# Allegro board OBcP_v2_3_V1.brd
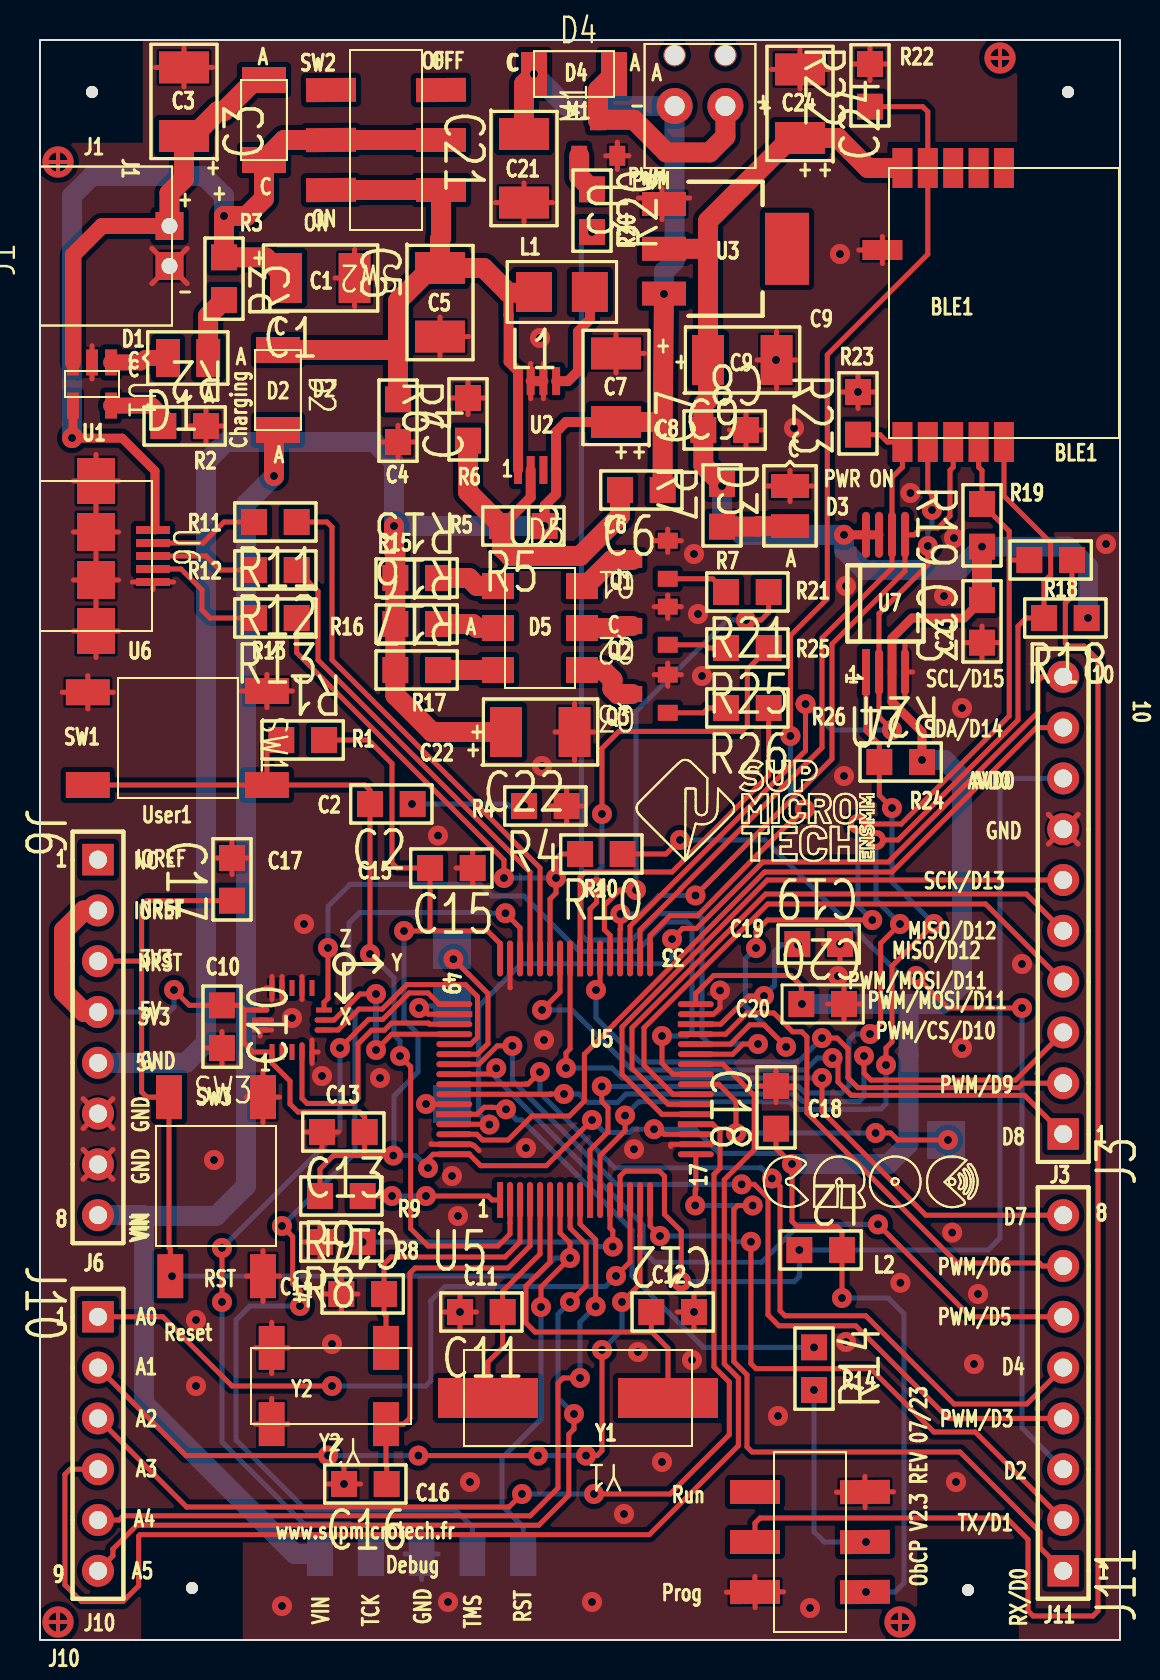
[diagram p0: board, top side]
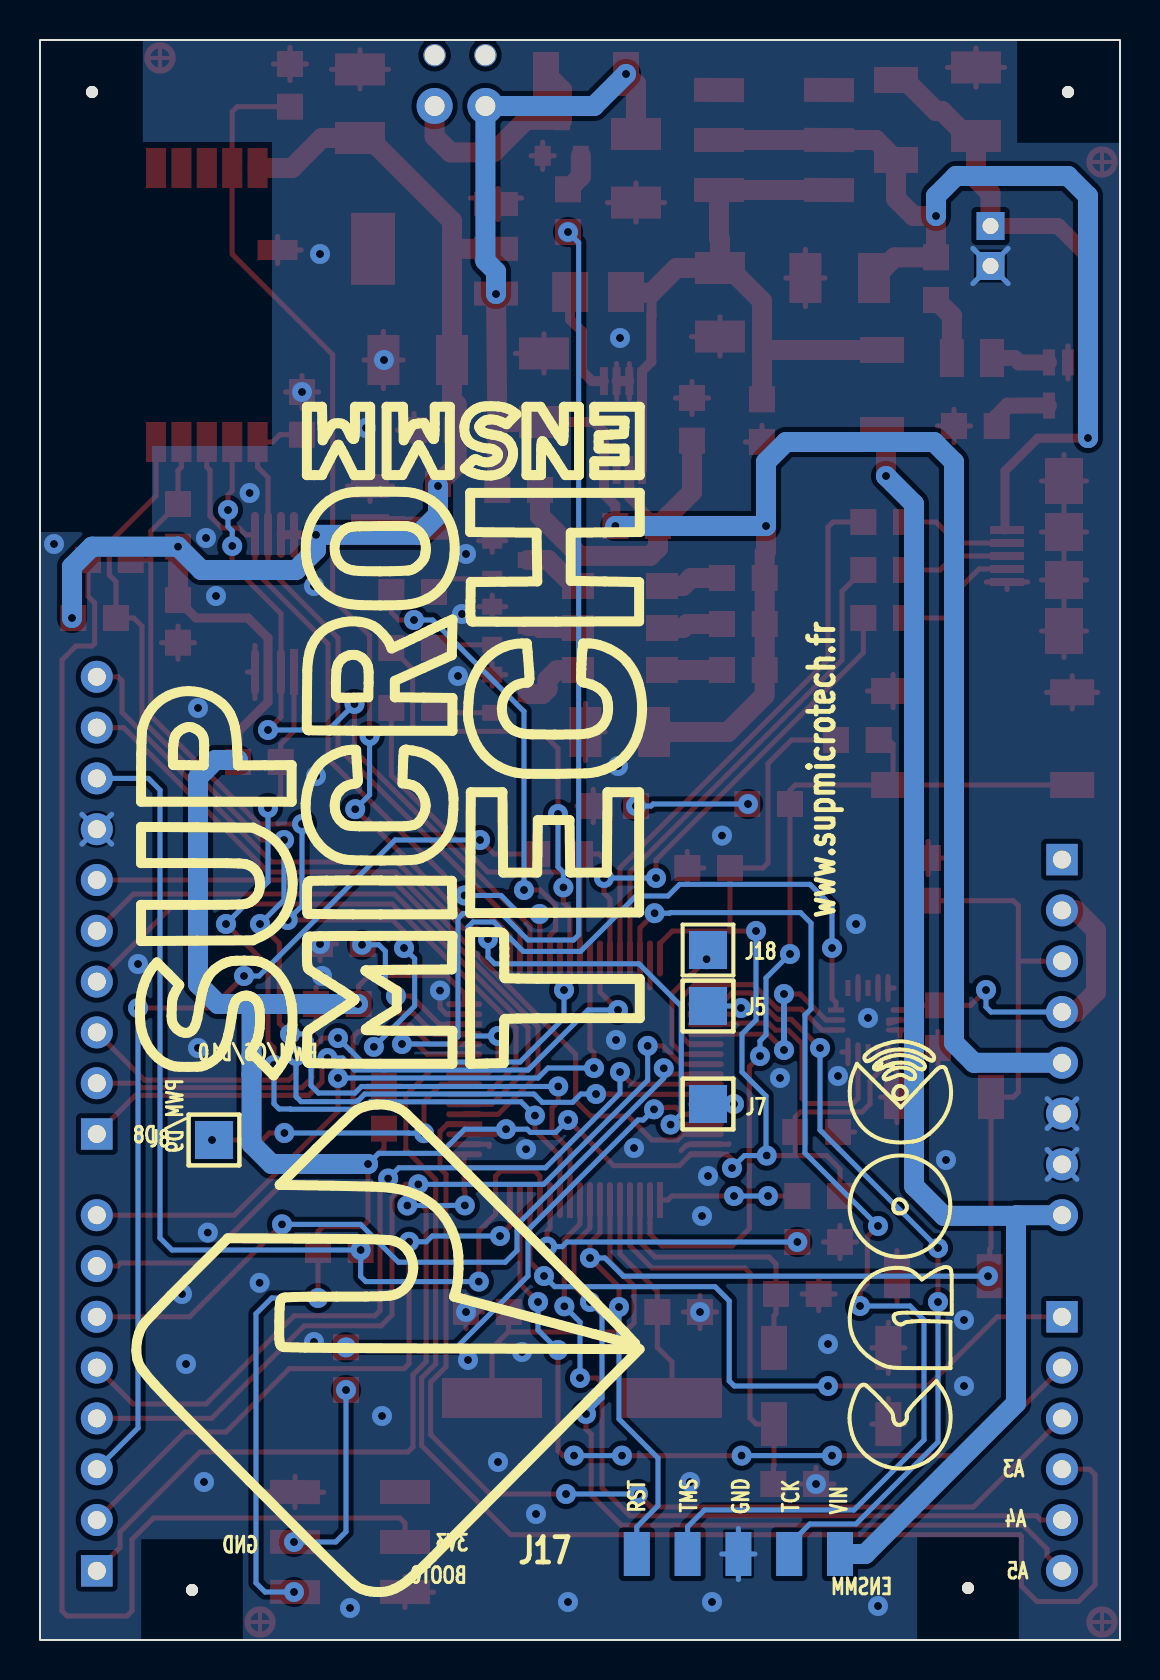
[diagram p1: board, bottom side, seen from below]

Outline 54 x 80 mm; copper layers: TOP, BOTTOM. Coordinates in mm from the lower left corner of the outline.
Outline path: rectangle 0,0 54,80

## Design rules (mm)
constraint set DEFAULT: min track width 0.254
net group BOOT0: nets BOOT0 N162657
net group BOOT1: nets BOOT1 N1626050
net group N10069: nets N10069 N12723
net group PA11: nets N1752391 PA11
net group PA12: nets N175467 PA12
net group PB1: nets N175669 PB1
net group PC6: nets N177253 PC6
net group PC8: nets N177329 PC8
net group PC9: nets N177405 PC9
net group PC13: nets N176603 PC13
net group VUSB: nets N120430 VUSB
net group 5V: nets 5V N14490 N177015 N177019 N1768891
net group PA10: nets N175521 PA10 USB_ID

## Placement (name value [footprint] x y rotation side)
BLE1  SPBTLE-RF0TR  [MODULEBLE]  48.2 73.6 270 top
C1  10u  [SMCT1210]  12.3 68.1 0 top
C2  100n  [SMC0805]  16.5 41.8 0 top
C3  10u  [SMCT1210]  7.2 75.2 90 top
C4  100n  [SMC0805]  17.9 59.9 90 top
C5  10u  [SMCT1210]  20 68.6 270 top
C6  27p  [SMC0805]  29 57.5 0 top
C7  10u  [SMCT1210]  28.8 60.9 90 top
C8  100n  [SMC0805]  35.3 60.5 180 top
C9  10u  [SMCT1210]  33.4 64 0 top
C10  100n  [SMC0805]  9.1 29.6 90 top
C11  20p  [SMC0805]  21 16.4 0 top
C12  20p  [SMC0805]  32.7 16.4 180 top
C13  100n  [SMC0805]  14.1 25.4 0 top
C14  4.3p  [SMC0805]  17.2 17.3 180 top
C15  100n  [SMC0805]  19.5 38.6 0 top
C16  4.3p  [SMC0805]  15.2 7.8 0 top
C17  100n  [SMC0805]  9.6 39.1 270 top
C18  100n  [SMC0805]  36.8 27.7 270 top
C19  4.7u  [SMC0805]  40 34.8 180 top
C20  100n  [SMC0805]  40.2 31.8 180 top
C21  10u  [SMCT1210]  24.2 75.3 270 top
C22  10u  [SMCT1210]  23.3 45.4 0 top
C23  100n  [SMC0805]  47.1 52 270 top
C24  10u 16V  [SMCT1210]  38 75.1 90 top
D1  LED_RED  [SMD0805]  6.4 64.1 0 top
D2  RS1J_13_F  [DIODESMA]  11.9 64.5 270 top
D3  LED_GREEN  [SMD0805]  37.5 57.7 270 top
D4  RS1J_13_F  [DIODESMA]  24.7 78.3 0 top
D5  LED TRI-COLOUR  [LEDRVB]  25 50.6 0 top
D6  RS1J_13_F  [DIODESMA]  11.2 74 90 top
J1  Batterie_Lithium  [CONALIM]  3.3 69.7 90 top
J3  Digital  [BLKCON100VHTM1SQSW10010]  51.16 25.3 90 top
J5  TX  [BLKCON100VHTM1SQW1001]  20.6 31.7 180 bottom
J6  Power  [BLKCON100VHTM1SQSW1008]  2.9 39.02 270 top
J7  RX  [BLKCON100VHTM1SQW1001]  20.6 26.8 180 bottom
J8  PC4  [BLKCON100VHTM1SQW1001]  45.3 25 180 bottom
J10  Analog  [BLKCON100VHTM1SQSW1006]  2.9 16.16 270 top
J11  Digital2  [BLKCON100VHTM1SQSW1008]  51.16 3.46 90 top
J13  PWM  [BORNIER2]  33 76.7 180 top
J17  Debug  [DEBUG_CON2]  14 4.3 0 bottom
J18  PD2  [BLKCON100VHTM1SQW1001]  20.6 34.5 180 bottom
L1  4.7uH  [SML1210]  24.7 67.4 0 top
L2  Perle_HF  [SMR0805]  40.1 19.5 180 top
M1  IRLML2803  [SOT23]  27.9 75.1 90 top
NOREF  -  [unnamed]  46.4 2.5 0 top
NOREF#2  -  [unnamed]  51.4 77.4 0 top
NOREF#3  -  [unnamed#2]  0.9 73.9 0 top
NOREF#4  -  [unnamed]  2.6 77.4 0 top
NOREF#5  -  [unnamed#2]  48 79.1 0 top
NOREF#6  -  [unnamed]  7.6 2.6 0 top
NOREF#7  -  [#2]  30.2 39.3 0 top
NOREF#8  -  [unnamed#2]  43 0.9 0 top
NOREF#9  -  [#2]  36.1 21.6 0 top
NOREF#10  -  [unnamed#2]  0.9 0.9 0 top
NOREF#11  -  [#2]  8.6 8.6 90 bottom
NOREF#12  -  [#2]  23.4 14.7 90 bottom
Q1  2N2222  [SOT23]  30.5 54 180 top
Q2  2N2222  [SOT23]  30.5 50.7 180 top
Q3  2N2222  [SOT23]  30.5 47.3 180 top
R1  4.7k  [SMR0805]  14.2 45 180 top
R2  2k  [SMR0805]  8.3 60.7 180 top
R3  470  [SMR0805]  9.2 67 90 top
R4  100  [SMR0805]  24.2 41.7 0 top
R5  976k  [SMR0805]  23.1 55.7 0 top
R6  309k  [SMR0805]  21.4 62.1 270 top
R7  100  [SMR0805]  34.1 57.8 270 top
R8  0  [SMR0805]  14 19.9 0 top
R9  0  [SMR0805]  14 22.2 0 top
R10  470  [SMR0805]  27 39.3 0 top
R11  22  [SMR0805]  10.7 55.9 0 top
R12  22  [SMR0805]  10.7 53.5 0 top
R13  22  [SMR0805]  10.7 51.1 0 top
R14  22  [SMR0805]  38.7 12.5 90 top
R15  100  [SMR0805]  19.9 53.1 180 top
R16  100  [SMR0805]  19.9 50.8 180 top
R17  100  [SMR0805]  19.9 48.5 180 top
R18  10k  [SMR0805]  50.2 51.1 0 top
R19  10k  [SMR0805]  47.1 56.8 270 top
R20  470  [SMR0805]  27.6 70.4 90 top
R21  1k  [SMR0805]  34.3 52.4 0 top
R22  47k  [SMR0805]  41.5 78.8 270 top
R23  100k  [SMR0805]  40.9 62.4 270 top
R24  100k  [SMR0805]  44.1 43.9 180 top
R25  1k  [SMR0805]  34.3 49.6 0 top
R26  1k  [SMR0805]  34.3 46.6 0 top
R27  22  [SMR0805]  51.6 54 180 top
SW1  User3  [PUSHBUTTONOBCP]  6.9 45.1 270 top
SW2  Interrupteur  [INTERUPTEUR]  17.3 75 180 top
SW3  Reset  [PUSHBUTTONOBCP]  8.8 22.7 0 top
SW4  Interrupteur  [INTERUPTEUR]  38.5 4.9 0 top
U1  MCP73831  [5LEADSOT23]  2.6 62.8 270 top
U2  MCP1642  [MSOP8]  23.9 58.5 0 top
U3  LD1117S33TR  [TO261AASOT223]  31.1 72.1 270 top
U4  LIS3DSH  [LGA_16]  12.6 31 90 top
U5  STM32L476RGT6  [QUAD50M64WG1260]  23 22 0 top
U6  USB  [CONUSB]  2.8 54.2 270 top
U7  M95640  [SOG65M8WG820L380]  41.3 48.4 0 top
Y1  CRYSTAL_8_MHz  [QUARTZ8MHZ]  26.9 12.1 180 top
Y2  ANS25-32.768KHZ-6-T  [QUARTZ36KHZ]  17.3 12.7 180 top

## Library data of the parts
BLE1 = SPBTLE-RF0TR
C1 C3 C5 C7 C9 C21 C22 C24 = CP
C2 C4 C6 C8 C10-C20 C23 = C
D1 D3 = LED0805
D2 D4 D6 = DIODE_3
D5 = LED TRI-COLOUR_1
J1 = CON2_0
J3 = CON10
J5 J7 J8 J18 = CON1
J6 J11 = CON8
J10 = CON6
J13 = CON2
J17 = CON5
L1 L2 = L
M1 = IRLML2803
Q1-Q3 = 2N2222_0
R1-R27 = R
SW1 SW3 = SW PUSHBUTTON_0
SW2 SW4 = SW KEY-Y1011_1
U1 = MCP73831
U2 = MCP1642_1
U3 = LD1117S33TR_0
U4 = LIS3DSH_0
U5 = STM32F411RET6
U6 = USB_con_3
U7 = M95640
Y1 = CRYSTAL
Y2 = ANS25-32_0.768KHZ-6-T

## Footprints (pads in the part's own frame, mm; a bottom-side part is the same pattern mirrored in y, then rotated)
5LEADSOT23
  rect 1.3x0.6 smd: 1(-1.079,0.953) 2(-1.079,0) 3(-1.079,-0.953) 4(1.079,-0.953) 5(1.079,0.953)
BLKCON100VHTM1SQSW1006
  rect 1.575x1.575 hole 0.9: 1(0,0)
  round 1.6 hole 0.9: 2(2.54,0) 3(5.08,0) 4(7.62,0) 5(10.16,0) 6(12.7,0)
BLKCON100VHTM1SQSW1008
  rect 1.575x1.575 hole 0.9: 1(0,0)
  round 1.6 hole 0.9: 2(2.54,0) 3(5.08,0) 4(7.62,0) 5(10.16,0) 6(12.7,0) 7(15.24,0) 8(17.78,0)
BLKCON100VHTM1SQSW10010
  rect 1.575x1.575 hole 0.9: 1(0,0)
  round 1.6 hole 0.9: 2(2.54,0) 3(5.08,0) 4(7.62,0) 5(10.16,0) 6(12.7,0) 7(15.24,0) 8(17.78,0) 9(20.32,0) 10(22.86,0)
BLKCON100VHTM1SQW1001
  rect 1.9x1.9 smd: 1(0,0)
BORNIER2
  round 1.12 hole 1: (-1.27,-2.54) (1.27,-2.54)
  round 1.8 hole 1: 1(-1.27,0) 2(1.27,0)
CONALIM
  rect 1.4x1.4 hole 0.8: +(1,-3.175) -(-1,-3.175)
CONUSB
  rect 0.4x1.7 smd: 1(-1.3,2.85) 2(-0.65,2.85) 3(0,2.85) 4(0.65,2.85) 5(1.3,2.85)
  rect 1.9x1.9 smd: 6(-1.2,0) 7(1.2,0)
  rect 2.3x1.9 smd: 8(-3.75,0) 9(3.75,0)
DEBUG_CON2
  rect 1.3x2.2 smd: 1(0,0) 2(2.54,0) 3(5.08,0) 4(7.62,0) 5(10.16,0)
DIODESMA
  rect 1.3x2.2 smd: 1(0,0) 2(4,0)
INTERUPTEUR
  rect 2.5x1.2 smd: 1(-2.75,2.5) 2(-2.75,0)
  rect 1.2x2.5 smd rot 90.4: 3(-2.75,-2.5) 4(2.75,2.5) 5(2.75,0) 6(2.75,-2.5)
LEDRVB
  rect 1.6x1.3 smd: 1(-2.1,2.1) 2(-2.1,0) 3(-2.1,-2.1) 4(2.1,-2.1) 5(2.1,0) 6(2.1,2.1)
LGA_16
  rect 0.8x0.25 smd: 1(-1.6,1) 2(-1.6,0.5) 3(-1.6,0) 4(-1.6,-0.5) 5(-1.6,-1) 9(1.6,-1) 10(1.6,-0.5) 11(1.6,0) 12(1.6,0.5) 13(1.6,1)
  rect 0.25x0.8 smd: 6(-0.5,-1.6) 7(0,-1.6) 8(0.5,-1.6) 14(0.5,1.6) 15(0,1.6) 16(-0.5,1.6)
MODULEBLE
  rect 2x1 smd: 1(0,0) 2(0,-1.27) 3(0,-2.54) 4(0,-3.81) 5(0,-5.08) 7(13.7,-5.08) 8(13.7,-3.81) 9(13.7,-2.54) 10(13.7,-1.27) 11(13.7,0)
  rect 1x2 smd: 6(4.1,-6.08)
MSOP8
  rect 0.4x1.4 smd: 1(0,0) 2(0.635,0) 3(1.27,0) 4(1.905,0) 5(1.905,4.445) 6(1.27,4.445) 7(0.635,4.445) 8(0,4.445)
PUSHBUTTONOBCP
  rect 1.3x2.2 smd: 1(2.349,4.445) 2(2.349,-4.508) 3(-2.349,4.445) 4(-2.286,-4.508)
QUAD50M64WG1260
  rect 0.3x1.8 smd: 1(0,0) 10(4.503,0) 40(4.003,12.078)
  oval 0.3x1.8 smd: 2(0.5,0) 3(1.001,0) 4(1.501,0) 5(2.002,0) 6(2.502,0) 7(3.002,0) 8(3.503,0) 9(4.003,0) 11(5.004,0) 12(5.504,0) 13(6.005,0) 14(6.505,0) 15(7.005,0) 16(7.506,0) 33(7.506,12.078) 34(7.005,12.078) 35(6.505,12.078) 36(6.005,12.078) 37(5.504,12.078) 38(5.004,12.078) 39(4.503,12.078) 41(3.503,12.078) 42(3.002,12.078) 43(2.502,12.078) 44(2.002,12.078) 45(1.501,12.078) 46(1.001,12.078) 47(0.5,12.078) 48(0,12.078)
  oval 1.8x0.3 smd: 17(9.792,2.286) 18(9.792,2.786) 19(9.792,3.287) 21(9.792,4.287) 22(9.792,4.788) 23(9.792,5.288) 24(9.792,5.789) 25(9.792,6.289) 26(9.792,6.789) 27(9.792,7.29) 28(9.792,7.79) 29(9.792,8.291) 31(9.792,9.291) 32(9.792,9.792) 49(-2.286,9.792) 51(-2.286,8.791) 52(-2.286,8.291) 53(-2.286,7.79) 54(-2.286,7.29) 55(-2.286,6.789) 56(-2.286,6.289) 57(-2.286,5.789) 58(-2.286,5.288) 59(-2.286,4.788) 61(-2.286,3.787) 62(-2.286,3.287) 63(-2.286,2.786) 64(-2.286,2.286)
  rect 1.8x0.3 smd: 20(9.792,3.787) 30(9.792,8.791) 50(-2.286,9.291) 60(-2.286,4.287)
QUARTZ8MHZ
  rect 5x2 smd: 1(-4.5,0) 2(4.5,0)
QUARTZ36KHZ
  rect 1.3x2.2 smd: 1(0,-1.905) 2(5.715,-1.905) 3(5.715,1.905) 4(0,1.905)
SMC0805
  rect 1.3x1.3 smd: 1(0,0) 2(2.134,0)
SMCT1210
  rect 1.6x2.5 smd: 1(0,0) 2(3.429,0)
SMD0805
  rect 1.2x1.9 smd: A(2.007,0) C(0,0)
SML1210
  rect 1.8x2 smd: 1(0,0) 2(2.794,0)
SMR0805
  rect 1.3x1.3 smd: 1(0,0) 2(2.134,0)
SOG65M8WG820L380
  rect 0.4x2.3 smd: 1(0,0)
  oval 0.4x2.3 smd: 2(0.65,0) 3(1.3,0) 4(1.951,0) 5(1.951,6.858) 6(1.3,6.858) 7(0.65,6.858) 8(0,6.858)
SOT23
  rect 1x0.8 smd: 1(-0.889,0.94) 2(-0.889,-0.965) 3(0.889,0)
TO261AASOT223
  rect 1.2x2.2 smd: 1(0,0) 2(2.54,0) 3(5.08,0)
  rect 3.6x2.2 smd: 4(2.54,6.35)
unnamed
  round 0.6 hole 3.2 unplated: (0,0)
unnamed#2
  rect 0.2x0.2 smd: (0,0)

## Nets
3.3V: BLE1.5(\VIN\) C8.2 C9.1 C10.2 C13.2 C15.1 C18.2 C20.2 C23.1 C24.1 J6.2 J6.4 L2.1 R1.1 R7.1 R9.1 R18.2 R19.2 R24.1 SW4.6 U3.2(\VOUT\) U4.1 U4.14(\VDD\) U5.19 U5.32 U5.48 U5.64 U7.3(\W\\\) U7.7 U7.8
5V: C6.2 C7.1 C21.1 C22.1 D4.1 J6.5 J13.2 R5.2 R15.2 R16.2 R17.2 U2.4(\VOUT\) U3.3
GND_ANALOG: R8.2 U5.12(\VSSA/VREF-\)
VDDA: J3.8 L2.2 U5.13
VIN: D2.2 J6.8 J17.1
0: BLE1.6 C1.2 C3.2 C4.1 C5.2 C7.2 C8.1 C9.2 C10.1 C11.1 C12.1 C13.1 C14.2 C15.2 C16.1 C17.1 C18.1 C19.1 C20.1 C21.2 C22.2 C23.2 C24.2 D3.C(\CATHODE\) J1.- J3.7 J6.6 J6.7 J17.3 M1.2(\S\) Q1.2(\EMITTER\) Q2.2(\EMITTER\) Q3.2(\EMITTER\) R2.1 R4.2 R6.1 R8.1 R22.1 R23.1 SW1.3 SW1.4 SW3.1 SW3.2 SW4.3 SW4.4 U1.2(\VSS\) U2.6 U2.7 U3.1 U4.5 U4.10 U4.12 U4.13 U4.15 U4.16 U5.18 U5.31 U5.47 U5.63 U6.5 U6.6 U6.7 U6.8 U6.9 U7.4 Y2.2 Y2.3
BOOT0: R14.2 U5.60
BOOT1: BLE1.10 R19.1 R27.2 U5.28
CLK_BLE: BLE1.7 R23.2 U5.34 U7.6
CRYS_8MHZ_1: C11.2 U5.5 Y1.2
CRYS_8MHZ_2: C12.2 U5.6 Y1.1
CS: U4.8 U5.25
IRQ_BLE: BLE1.4 R22.2 U5.33
MISO_BLE: BLE1.8 U5.35 U7.2
MOSI_BLE: BLE1.9 U5.36 U7.5
NRST: C17.2 J6.3 J17.5 SW3.3 SW3.4 U5.7
PA0: J10.1 U5.14
PA1: J10.2 U5.15
PA2: J11.2 U5.16
PA3: J11.1 U5.17
PA4: J10.3 U5.20
PA5: J3.6 U5.21
PA6: J3.5 U5.22
PA7: J3.4 U5.23
PA8: J11.8 U5.41
PA9: J3.1 U5.42
PA10: J11.3 R10.2
PA11: R11.2 U5.44
PA12: R12.2 U5.45
PA13: J17.4 U5.46
PA14: J17.2 U5.49
PA15: J5.1 U5.50
PB0: J10.4 U5.26
PB1: R20.1 U5.27
PB3: J11.4 U5.55
PB4: J11.6 U5.56
PB5: J11.5 U5.57
PB6: J3.3 U5.58
PB7: J7.1 U5.59
PB8: J3.10 U5.61
PB9: J3.9 U5.62
PB10: J11.7 U5.29
PC0: J10.6 U5.8
PC1: J10.5 U5.9
PC2: BLE1.11 R18.1 U5.10
PC3: R24.2 U5.11 U7.1
PC4: J8.1 U5.24
PC6: R21.2 U5.37
PC7: J3.2 U5.38
PC8: R25.2 U5.39
PC9: R26.2 U5.40
PC10: U4.4 U5.51
PC11: U4.7 U5.52
PC12: U4.6 U5.53
PC13: C2.1 R1.2 SW1.1 SW1.2 U5.2
PC14: C14.1 U5.3 Y2.1
PC15: C16.2 U5.4 Y2.4
PD2: J18.1 U5.54
USB_ID: R10.1 R13.2 U5.43
VUSB: C1.1 D6.1 R3.2 SW2.2 SW2.5 U1.4 U6.1(\VCC\)
N04115: C19.2 U5.30
N10061: C3.1 D6.2 J1.+ U1.3
N10069: C4.2 C5.1 D2.1 L1.1 SW2.1 SW2.4 U2.1 U2.8
N11773: R2.2 U1.5
N12723: L1.2 U2.5
N14490: C6.1 R5.1 R6.2 U2.2
N017320: D3.A R7.2
N54486: U3.4
N105400: D1.C(\CATHODE\) U1.1
N113222: R9.2 U5.1
N120430: D1.A R3.1
N162657: R14.1 SW4.5
N175467: R12.1 U6.3
N175501: J6.1
N175511: D4.2 J13.1 M1.3
N175521: R13.1 U6.4
N175669: M1.1 R20.2
N176603: C2.2 R4.1
N177015: D5.1 R15.1
N177019: D5.3 R17.1
N177181: D5.5 Q2.3
N177185: D5.4(6) Q3.3
N177253: Q1.1 R21.1
N177329: Q2.1 R25.1
N177405: Q3.1 R26.1
N1626050: R27.1 SW4.2
N1752391: R11.1 U6.2
N1768891: D5.2 R16.1
N1770832: D5.6 Q1.3

Pads without a net: BLE1 1 2 3; SW2 3 6; SW4 1; U2 3; U4 2 3 9 11

## Via types
v1: diameter 1, hole 0.4, TOP to BOTTOM, 176 vias

## Routing (per net, layer and track width the routed paths; a pad name or vN(x,y) marks a point on that pad's centre or on a via; arc(x,y) is an arc through that point)
3.3V: length 232.6
  TOP w0.254: 16.23,24.22 14.67,24.22 14,23.55 R9.1 ; 16.23,24.22 16.23,25.4 C13.2 16.23,26.15 15.98,26.4 12.9,26.4 12.5,26.8 12.5,27.95 11.6,28.85 U4.1 10.65,29.4 10.2,29.85 10.2,31.5 ; 16.23,24.22 v1(17.66,24.22) ; 10.2,31.5 10.2,31.52 9.99,31.73 C10.2 7.47,31.73 v1(6.7,32.5) ; 10.2,31.5 U4.14 11.35,31.5 ; v1(19.4,23.6) 19.4,24.03 19.65,24.29 U5.64 21.46,24.29 22.03,23.72 25.32,23.72 v1(27.6,26) ; C18.2 36.8,24.59 37.05,24.33 37.07,24.33 v1(37.6,23.8) 37.6,20.93 37.85,20.68 39.85,20.68 40.1,20.43 L2.1 v1(40.1,17.1) ; U5.19 31.21,25.29 30.96,25.54 v1(30.7,25.54) ; R1.1 16.42,45 17.6,43.82 17.6,38.85 17.85,38.6 C15.1 19.5,35.45 ; 19.5,35.45 22.38,35.45 23,34.83 U5.48 ; 19.5,35.45 v1(18.2,35.45) ; U5.32 32.79,32.33 33.69,33.23 37.55,33.23 38.07,32.7 C20.2
  TOP w0.45: C23.1 46.2,51.1 43.6,51.1 42.6,50.1 U7.3 42.6,46.91 44.1,45.41 v1(44.1,44) R24.1 ; v1(40.2,55.26) U7.8 U7.7
  TOP w1: R7.1 33.17,58.73 C8.2 33.17,61.78 33.4,62.01 C9.1 33.4,69.56 ; 33.4,69.56 U3.2 ; 33.4,69.56 33.4,70.95 37.55,75.1 C24.1 39.9,75.1 41.4,73.6 BLE1.5 ; J6.2 2.2,36.48 1.2,35.48 1.2,32.4 2.2,31.4 J6.4 ; C23.1 v1(47.1,54.67) ; v1(38.1,31.8) C20.2
  BOTTOM w0.254: v1(40.1,17.1) 42.41,17.1 43.2,16.31 43.2,2.85 42.75,2.4 v1(41.3,2.4) ; v1(37.6,23.8) 37.07,24.33 33.97,24.33 32.76,25.54 v1(30.7,25.54) 29.64,25.54 29.48,25.38 28.22,25.38 v1(27.6,26) ; v1(17.66,24.22) 17.9,24.22 ; 17.9,24.22 18.78,24.22 v1(19.4,23.6) ; 17.9,24.22 17.7,24.42 17.7,27.2 18.9,28.4 18.9,30.3 18.2,31 v1(18.2,35.45) ; J6.4 6.45,31.4 6.7,31.65 v1(6.7,32.5)
  BOTTOM w1: v1(52.4,51.1) 52.4,53.67 51.4,54.67 v1(47.1,54.67) 45.93,53.5 41.2,53.5 40.2,54.5 v1(40.2,55.26) 35.1,55.26 34.1,56.26 v1(34.1,57.7) ; v1(44.1,44) 45.23,44 46.1,43.13 46.1,32.8 45.1,31.8 43.42,31.8 ; 43.42,31.8 43.42,29.22 43.43,29.22 43.43,28.28 43.42,28.28 43.42,24.8 42.42,23.8 v1(37.6,23.8) ; 43.42,31.8 v1(38.1,31.8)
5V: length 111.4
  TOP w0.5: C7.1 26.3,60.9 25.8,60.4 25.8,59.61 25.8,59.6 U2.4 25.8,57.3 25.23,56.73 v1(25.23,55.7)
  TOP w1: 31.13,60.84 31.08,60.9 C7.1 ; 31.13,60.84 v1(31.2,67.3) ; 31.13,60.84 C6.2 ; C22.1 19.6,45.4 17.77,47.24 R17.2 R16.2 R15.2 17.77,54.36 17.7,54.43 v1(17.7,55.7) ; C21.1 24.2,77.8 v1(24.7,78.3)
  BOTTOM w1: J6.5 7.3,28.86 8.3,29.86 8.3,58.9 9.3,59.9 16.7,59.9 17.7,58.9 v1(17.7,55.7) v1(25.23,55.7) ; v1(24.7,78.3) 26.3,76.7 J13.2 31.73,68.96 31.2,68.43 v1(31.2,67.3)
GND_ANALOG: length 15
  TOP w0.254: U5.12 28.5,22 28.5,20.6 28.64,20.46 v1(28.64,19.67)
  BOTTOM w0.254: v1(16.13,19.9) 27.66,19.9 27.89,19.67 v1(28.64,19.67)
VDDA: length 52.7
  TOP w0.254: U5.13 29,23.19 29.26,23.44 30.97,23.44 31.22,23.19 31.22,21.28 32.06,20.45 v1(32.06,17.92)
  BOTTOM w0.254: J3.8 48.58,43.08 48,42.5 48,20.1 47.4,19.5 v1(37.97,19.5) 37.97,18.17 37.71,17.92 v1(32.06,17.92)
VIN: length 67.8
  TOP w1: v1(11.7,58.2) 11.7,60.3 D2.2
  BOTTOM w1: 5.2,21.21 5.17,21.24 J6.8 ; 5.2,21.21 5.2,11.84 12.74,4.3 J17.1 ; 5.2,21.21 8.81,21.21 10.3,22.7 10.3,56.8 v1(11.7,58.2)
0: length 235.4
  TOP w0.254: 14.24,17.3 C14.2 ; C14.2 15.89,17.3 ; C14.2 15.07,18.13 ; C14.2 15.07,16.47 ; C24.2 39.43,78.53 ; C24.2 38,77.55 ; C24.2 36.57,78.53 ; C24.2 38,79.51 ; 50.42,39.8 J3.7 ; J3.7 51.9,41.28 ; J3.7 50.42,41.28 ; J3.7 51.9,39.8 ; 7.47,60.7 R2.1 ; R2.1 8.3,59.87 ; R2.1 9.13,60.7 ; R2.1 8.3,61.53 ; 40.67,78.8 R22.1 ; R22.1 41.5,79.63 ; R22.1 41.5,77.97 ; R22.1 42.33,78.8 ; 14.3,7.8 v1(15.2,7.8) ; v1(15.2,7.8) 16.03,7.8 ; v1(15.2,7.8) 15.2,8.63 ; v1(21,16.4) 21,17.23 ; v1(21,16.4) 21,15.57 ; v1(21,16.4) 21.83,16.4 ; v1(21,16.4) 20.17,16.4 ; 2.8,54.27 U6.6 ; U6.6 2.8,56.53 ; U6.6 3.93,55.4 ; U6.6 1.67,55.4 ; C18.1 36.9,27.6 37.7,27.6 ; C18.1 36.8,28.53 ; C18.1 36.8,26.87 ; C18.1 35.97,27.7 ; C18.1 37.63,27.7 ; 36.83,62.57 C9.2 ; C9.2 37.81,64 ; C9.2 36.83,65.43 ; C9.2 35.85,64 ; 2.39,46.56 SW1.4 ; SW1.4 2.39,48.21 ; SW1.4 1.11,47.39 ; SW1.4 3.67,47.39 ; 13.1,32.02 U4.10 13.1,33.18 ; 10.76,10.79 Y2.3 ; Y2.3 11.59,12.07 ; Y2.3 12.41,10.79 ; U5.18 31.54,24.79 31.54,24.68 ; 11.58,31 U4.15 11.58,30.82 ; Q3.2 31.39,48.84 ; Q3.2 32.07,48.27 ; Q3.2 30.71,48.27 ; Q3.2 31.39,47.69 ; 40.2,30.97 C20.1 ; C20.1 39.37,31.8 ; C20.1 40.2,32.63 ; C20.1 41.03,31.8 ; C4.1 18.73,59.9 ; C4.1 17.07,59.9 ; C4.1 17.9,59.07 ; C4.1 17.9,60.73 ; 47.1,49.04 C23.2 ; C23.2 47.93,49.87 ; C23.2 46.27,49.87 ; C23.2 47.1,50.69 ; 10.32,27.14 SW3.1 ; SW3.1 11.98,27.14 ; SW3.1 11.15,28.42 ; SW3.1 11.15,25.87 ; 13.6,29.76 13.6,30 ; v1(32.7,16.4) 32.7,17.23 ; v1(32.7,16.4) 31.87,16.4 ; v1(32.7,16.4) 32.7,15.57 ; C7.2 28.8,65.31 ; C7.2 28.8,63.35 ; C7.2 30.23,64.33 ; 12.1,32.02 U4.12 12.1,33.18 ; 5.65,52.52 U6.5 ; U6.5 4.62,52.9 ; U6.5 6.68,52.9 ; 13.27,25.4 C13.1 ; C13.1 14.1,24.57 ; C13.1 14.93,25.4 ; C8.1 35.3,61.33 ; C8.1 35.3,59.67 ; C8.1 36.13,60.5 ; C8.1 34.47,60.5 ; 2.16,24.52 J6.7 ; J6.7 3.64,24.52 ; J6.7 3.64,23.04 ; J6.7 2.16,23.04 ; R8.1 14.83,19.9 ; R8.1 13.17,19.9 ; R8.1 14,19.07 ; R8.1 14,20.73 ; U6.9 2.8,51.78 ; U6.9 1.67,50.45 ; U6.9 3.93,50.45 ; U6.9 2.8,49.12 ; 10.07,47.45 SW1.3 ; SW1.3 12.62,47.45 ; SW1.3 11.35,46.62 ; SW1.3 11.35,48.28 ; 25.51,41.7 R4.2 ; R4.2 26.33,42.53 ; R4.2 27.16,41.7 ; R4.2 26.33,40.87 ; 40.94,69.5 BLE1.6 ; BLE1.6 42.12,68.82 ; BLE1.6 42.12,70.18 ; 31.1,71.02 U3.1 ; U3.1 29.92,72.1 ; U3.1 31.1,72.58 ; U3.1 32.48,72.1 ; 31.39,54.39 Q1.2 ; Q1.2 31.39,55.54 ; Q1.2 30.71,54.97 ; Q1.2 32.07,54.97 ; Y2.2 12.41,14.61 ; Y2.2 10.76,14.61 ; Y2.2 11.59,15.88 ; Y2.2 11.59,13.33 ; C15.2 21.63,39.43 ; C15.2 20.81,38.6 ; C15.2 21.63,37.77 ; 13.6,28.82 U4.5 13.9,29.4 ; U5.47 23.5,32.62 23.51,32.61 ; U6.7 3.93,53 ; U6.7 2.8,51.87 ; U6.7 2.8,54.13 ; U6.7 1.67,53 ; U4.13 11.6,33.18 ; U4.13 11.6,32.02 ; U4.13 11.3,32.6 ; M1.2 29.44,74.21 ; M1.2 28.29,74.21 ; M1.2 28.87,73.53 ; M1.2 28.87,74.89 ; 5.77,78.63 C3.2 ; C3.2 8.63,78.63 ; C3.2 7.2,77.65 ; C3.2 7.2,79.61 ; J6.6 3.64,25.58 ; J6.6 2.16,25.58 ; J6.6 3.64,27.06 ; J6.6 2.16,27.06 ; 25.17,63.82 U2.6 25.17,62.07 ; SW4.4 41.26,6.62 ; SW4.4 42.68,7.41 ; SW4.4 39.82,7.39 ; SW4.4 41.24,8.18 ; 9.6,38.27 C17.1 ; C17.1 8.77,39.1 ; C17.1 9.6,39.93 ; C17.1 10.43,39.1 ; 24.2,70.89 C21.2 ; C21.2 25.63,71.87 ; C21.2 22.77,71.87 ; C21.2 24.2,72.85 ; 15.73,66.67 15.73,68.1 ; 15.73,68.1 15.73,69.53 ; 15.73,68.1 16.71,68.1 ; 15.73,68.1 14.75,68.1 ; 2.6,64.71 U1.2 2.6,63.05 ; 40,33.97 v1(40,34.8) ; v1(40,34.8) 39.17,34.8 ; v1(40,34.8) 40.83,34.8 ; 31.39,51.09 Q2.2 ; Q2.2 30.71,51.67 ; Q2.2 32.07,51.67 ; Q2.2 31.39,52.24 ; 25.75,45.4 C22.2 ; C22.2 26.73,46.83 ; C22.2 26.73,43.97 ; C22.2 27.71,45.4 ; 36.37,57.7 D3.C ; D3.C 38.63,57.7 ; D3.C 37.5,56.92 ; D3.C 37.5,58.48 ; 21.95,24.47 21.7,24.72 21.64,24.72 21.57,24.79 U5.63 19.57,24.79 19.55,24.81 ; U6.8 2.8,59.28 ; U6.8 3.93,57.95 ; U6.8 1.67,57.95 ; U6.8 2.8,56.62 ; 5.6,67.82 J1.- ; J1.- 7.35,69.58 ; J1.- 7.35,67.82 ; J1.- 5.6,69.58 ; 24.54,62.07 U2.7 24.54,63.82 ; v1(34,32.47) 34,31.61 33.68,31.29 U5.31 ; 11.58,30.5 U4.16 11,30.2 ; 8.27,29.6 C10.1 ; C10.1 9.1,28.77 ; C10.1 9.1,30.43 ; SW4.3 37.18,2.41 ; SW4.3 34.32,2.39 ; SW4.3 35.74,3.18 ; SW4.3 35.76,1.62 ; 20,65.17 20,66.15 ; 20,65.17 21.43,65.17 ; 20,65.17 20,64.19 ; 43.25,47.07 U7.4 ; U7.4 43.25,49.73 ; U7.4 43.63,48.4 ; 20.57,62.1 R6.1 ; R6.1 21.4,61.27 ; R6.1 21.4,62.93 ; R6.1 22.23,62.1 ; 11.15,16.91 SW3.2 ; SW3.2 10.32,18.19 ; SW3.2 11.98,18.19 ; SW3.2 11.15,19.47 ; 40.9,61.57 v1(40.9,62.4) ; v1(40.9,62.4) 40.9,63.23 ; v1(40.9,62.4) 41.73,62.4 ; v1(40.9,62.4) 40.07,62.4
  TOP w0.5: U2.6 U2.7
  BOTTOM w0.254: J3.7 51.9,39.8 ; J3.7 50.42,39.8 ; J3.7 51.9,41.28 ; J3.7 50.42,41.28 ; 2.16,23.04 J6.7 ; J6.7 2.16,24.52 ; J6.7 3.64,24.52 ; J6.7 3.64,23.04 ; 19.08,3.02 J17.3 ; J17.3 19.08,5.58 ; J17.3 18.25,4.3 ; J17.3 19.91,4.3 ; J6.6 3.64,25.58 ; J6.6 3.64,27.06 ; J6.6 2.16,25.58 ; J6.6 2.16,27.06 ; J1.- 7.35,69.58 ; J1.- 5.6,67.82 ; J1.- 5.6,69.58 ; J1.- 7.35,67.82 ; v1(32.7,54.3) 32.5,54.3
  vias: v1(7.8,16) v1(7.8,12.7) v1(8.7,24) v1(12.1,1.7) v1(12.6,31.1) v1(13.2,35.8) v1(14.1,28.2) v1(14.6,14.8) v1(17,28.1) v1(19.9,40.22) v1(20.4,1.9) v1(20.6,23.2) v1(20.9,21.2) v1(21.5,7.9) v1(24.3,24.6) v1(25,65.1) v1(25.1,43.7) v1(25.2,30) v1(27.6,1.9) v1(29.2,6.3) v1(29.7,24.54) v1(29.9,14.4) v1(31.1,8.9) v1(32.6,14) v1(32.9,51.3) v1(33.1,48.2) v1(36.8,64) v1(36.9,11.2) v1(37.7,60.6) v1(38.5,1.6) v1(39.9,33.2) v1(40,69.3) v1(40.2,43.2) v1(40.3,52.7) v1(40.3,14.9) v1(43.02,17.86) v1(43.52,57.35) v1(45.2,52.2) v1(45.61,20.37) v1(45.7,55.1) v1(45.8,7.9) v1(46.1,46.6) v1(46.1,29.6) v1(46.7,13.8) v1(46.9,17.3) v1(49.1,33.8) v1(53.3,54.8)
BOOT0: length 24.4
  TOP w0.254: U5.60 21.86,26.29 22.21,26.64 22.62,26.64 22.63,26.62 23.21,26.62 v1(23.3,26.53)
  BOTTOM w0.254: v1(23.3,26.53) 23.83,26 24.1,26 29.6,20.5 29.6,18.2 33.17,14.63 v1(38.7,14.63)
BOOT1: length 48.5
  TOP w0.254: v1(40.9,40.8) 43.06,40.8 48.46,46.2 48.46,54 ; v1(41.61,36) 36.37,36 35.8,35.43 v1(35.8,34.6) ; BLE1.10 46.93,58.65 47.1,58.48 R19.1 48.46,55.44 48.46,54 ; U5.28 34.52,29.79 35.49,30.76 36.2,30.76 v1(37.31,29.66) ; 48.46,54 R27.2
  BOTTOM w0.254: v1(37.31,29.66) 35.27,31.7 35.27,34.07 v1(35.8,34.6) ; v1(40.9,40.8) 40.9,36.71 v1(41.61,36)
CLK_BLE: length 33.6
  TOP w0.254: U5.34 30.01,35.51 32.02,37.52 32.02,37.54 39.1,44.62 39.1,50.1 42.6,53.6 U7.6 42.6,58.13 43.12,58.65 BLE1.7 42.37,59.9 42,60.27 R23.2
CRYS_8MHZ_1: length 11
  TOP w0.254: Y1.2 22.4,13.9 23.13,14.63 C11.2 23.13,17.43 25,19.3 U5.5
CRYS_8MHZ_2: length 17.8
  TOP w0.254: U5.6 25.5,18.9 24.3,17.7 24.3,15.86 24.75,15.4 30.59,15.4 ; C12.2 30.57,15.42 30.59,15.4 ; 30.59,15.4 31.4,14.59 Y1.1
CS: length 36.1
  TOP w0.254: v1(31.1,30.2) 31.1,28.84 31.65,28.29 U5.25 ; U4.8 14.2,31.88 14.4,32.08 v1(14.4,34.6)
  BOTTOM w0.254: v1(14.4,34.6) 14.4,36.68 15.5,37.78 22.02,37.78 22.6,37.2 24.2,37.2 26.97,34.43 29.83,34.43 31.3,35.9 32.35,35.9 32.6,35.65 32.6,30.45 32.35,30.2 v1(31.1,30.2)
IRQ_BLE: length 52.5
  TOP w0.254: R22.2 44.14,76.67 44.39,76.41 BLE1.4 44.39,69.29 39.37,64.27 39.37,52.07 37.52,50.22 v1(37.52,45.2) ; U5.33 30.51,35.22 31.5,36.21 32.87,36.21 35.87,39.28 35.89,39.28 37.62,41.01 37.71,41.01 v1(38.24,41.54)
  BOTTOM w0.254: v1(37.52,45.2) 37.52,42.26 v1(38.24,41.54)
MISO_BLE: length 37.1
  TOP w0.254: v1(44.6,56.5) 44.6,57.25 44.39,57.46 BLE1.8 ; v1(42.6,45.5) 41.95,46.15 U7.2 41.95,51.32 44.39,53.76 v1(44.39,54.7) ; U5.35 29.5,35.7 38.27,44.46 v1(38.27,46.8)
  BOTTOM w0.254: v1(38.27,46.8) 39.57,45.5 v1(42.6,45.5) ; v1(44.6,56.5) 44.6,55.67 44.39,55.46 v1(44.39,54.7)
MOSI_BLE: length 35.1
  TOP w0.254: BLE1.9 45.66,58.65 45.5,58.49 45.5,56.2 44.9,55.6 44.05,55.6 43.71,55.26 U7.5 43.25,53.45 39.6,49.8 39.6,44.05 v1(32.77,37.23) ; U5.36 29,35.53 29.02,35.55 v1(29.02,36.3)
  BOTTOM w0.254: v1(32.77,37.23) 30.95,37.23 30.02,36.3 v1(29.02,36.3)
NRST: length 66.7
  TOP w0.254: J6.3 3.95,33.94 3.96,33.95 5.08,33.95 ; v1(6.6,18.19) SW3.4 6.51,19.55 6.45,19.61 SW3.3 5.33,27.14 5.08,27.4 5.08,33.95 ; U5.7 26,20.35 26.5,19.85 v1(26.5,19.1) 25.05,17.65 v1(25.05,16.65) ; 5.08,33.95 5.08,36.71 5.33,36.97 C17.2
  BOTTOM w0.254: v1(25.05,16.65) 25.05,11.05 23.1,9.1 23.1,6.71 24.16,5.65 J17.5 ; v1(26.5,19.1) 25.75,19.1 24.84,18.19 v1(6.6,18.19)
PA0: length 36
  TOP w0.254: v1(28.8,18.2) 29.5,18.9 U5.14 ; v1(14.6,12.7) 9.6,12.7 6.14,16.16 J10.1
  BOTTOM w0.254: v1(28.8,18.2) 28.27,17.67 20.25,17.67 19.54,16.96 19.54,12.95 19.29,12.7 v1(14.6,12.7)
PA1: length 40.4
  TOP w0.254: v1(27.3,9.22) 27.85,9.22 28.1,9.47 v1(28.1,14.5) ; v1(14.4,9.22) 7.3,9.22 J10.2 ; v1(18.92,9.22) v1(24.9,9.22) ; v1(29.1,16.9) 30,17.8 30,20.22 30.01,20.22 U5.15
  BOTTOM w0.254: v1(24.9,9.22) v1(27.3,9.22) ; v1(29.1,16.9) 29.1,15.5 v1(28.1,14.5) ; v1(14.4,9.22) v1(18.92,9.22)
PA2: length 31.6
  TOP w0.254: v1(31,20.2) 30.51,20.69 U5.16 ; v1(35.55,19.91) 35.55,13.82 35.8,13.57 41.53,13.57 44.7,10.4 46.76,10.4 J11.2
  BOTTOM w0.254: v1(35.55,19.91) 34.68,19.91 34.39,20.2 v1(31,20.2)
PA3: length 37.4
  TOP w0.254: J11.1 50,4.62 50,5.4 46,9.4 35.6,9.4 35.35,9.65 35.35,13.26 34.69,13.92 34.69,21.54 34.88,21.72 v1(35.63,21.72) ; U5.17 32.79,22.52 32.76,22.48 v1(32.76,21.73)
  BOTTOM w0.254: v1(32.76,21.73) 33.51,21.73 33.52,21.72 v1(35.63,21.72)
PA4: length 51.9
  TOP w0.254: U5.20 33.64,25.79 34,25.43 34,23.58 33.7,23.28 33.7,13.66 34.46,12.89 34.46,10.26 31.5,7.3 v1(27.7,7.3) ; J10.3 7.33,6.65 23.45,6.65 v1(24.1,7.3)
  BOTTOM w0.254: v1(24.1,7.3) v1(27.7,7.3)
PA5: length 32
  TOP w0.254: U5.21 31.09,26.29 29.1,28.28 29.1,30.65 36.37,38 J3.6
PA6: length 31.1
  TOP w0.254: U5.22 31.41,26.79 29.6,28.6 29.6,30.61 36.29,37.3 49.32,37.3 J3.5
PA7: length 30.2
  TOP w0.254: U5.23 31.65,27.29 30.2,28.74 30.2,30.61 36.39,36.8 47.28,36.8 J3.4
PA8: length 34.4
  TOP w0.254: v1(26.3,28.6) 26.3,29.35 26.5,29.56 U5.41 ; v1(39.1,28.1) 39.1,26.43 44.29,21.24 J11.8
  BOTTOM w0.254: v1(39.1,28.1) 29.1,28.1 28.6,28.6 v1(26.3,28.6)
PA9: length 32.6
  TOP w0.254: v1(39.62,29.1) 39.9,28.82 39.9,27.9 40.57,27.23 40.74,27.23 49.23,27.23 J3.1 ; v1(25.1,31.5) 26,32.4 26,32.93 U5.42
  BOTTOM w0.254: v1(39.62,29.1) 38.87,29.1 38.27,28.5 29.6,28.5 26.6,31.5 v1(25.1,31.5)
PA10: length 47.6
  TOP w0.254: R10.2 31.3,39.3 v1(32,40) ; v1(49.1,31.6) 45.4,31.6 v1(43.8,33.2)
  BOTTOM w0.254: v1(32,40) 36.25,40 43.05,33.2 v1(43.8,33.2) ; v1(49.1,31.6) 49.1,10.6 J11.3
PA11: length 27.7
  TOP w0.254: U5.44 25,38.6 20.51,43.1 14.6,49.01 14.6,55.65 14.35,55.9 R11.2
PA12: length 24.3
  TOP w0.254: R12.2 13.9,52.43 13.9,49 24.5,38.4 U5.45
PA13: length 56.2
  TOP w0.254: U5.46 24,35.61 v1(23.27,36.34) ; v1(12.1,20.7) 12.63,20.17 12.63,17.82 13,17.45 v1(13,16.7)
  BOTTOM w0.254: J17.4 21.62,5.66 20.78,6.5 13.3,6.5 9.8,10 9.8,16 10.5,16.7 v1(13,16.7) ; v1(12.1,20.7) 15.75,24.35 15.75,31.25 15.45,31.55 15.45,35.85 15.97,36.37 22.49,36.37 22.52,36.34 v1(23.27,36.34)
PA14: length 39.3
  TOP w0.254: v1(15,29.6) 16.43,31.03 17.14,31.03 18.46,32.35 19.4,32.35 19.96,31.79 U5.49 ; v1(9.1,19.6) v1(9.1,16.9)
  BOTTOM w0.254: v1(9.1,16.9) 9.1,9.9 13.2,5.8 15.51,5.8 16.54,4.77 J17.2 ; v1(15,29.6) 15,25.5 v1(9.1,19.6)
PA15: length 3.6
  TOP w0.254: U5.50 19.41,31.29 19.1,31.6 v1(18.95,31.6)
  BOTTOM w0.254: v1(18.95,31.6) 19.05,31.7 J5.1
PB0: length 68
  TOP w0.254: U5.26 34.15,28.79 35.71,27.23 35.71,24.51 34.21,23.01 34.21,13.81 34.92,13.1 34.92,9.72 30.47,5.27 5.01,5.27 4.93,5.19 4.93,2.71 4.15,1.92 2.08,1.92 1.25,2.75 1.25,8.28 1.51,8.54 J10.4
PB1: length 54.3
  TOP w0.254: v1(35.9,29.8) 35.15,29.8 34.64,29.29 U5.27
  BOTTOM w0.254: v1(35.9,29.8) 33.47,29.8 33.1,30.17 33.1,36.07 32.85,36.33 30.93,36.33 29.6,35 27.32,35 27.07,35.25 27.07,69.87 v1(27.6,70.4)
PB3: length 43
  TOP w0.254: J11.4 45.42,11.08 40.79,15.71 36.94,15.71 36.4,16.25 36.4,22.1 35.72,22.78 v1(35.08,22.78) ; U5.55 21.95,28.79 22.86,29.71 v1(23.62,29.71)
  BOTTOM w0.254: v1(23.62,29.71) 23.62,27.98 28.82,22.78 v1(35.08,22.78)
PB4: length 38.3
  TOP w0.254: J11.6 46.52,16.16 v1(41.9,20.78) ; v1(22.81,28.59) 22.79,28.59 22.5,28.3 21.87,28.3 21.86,28.29 U5.56
  BOTTOM w0.254: v1(22.81,28.59) 22.81,28.09 30.15,20.75 30.15,19.47 30.73,18.89 36.08,18.89 37.97,20.78 v1(41.9,20.78)
PB5: length 42.6
  TOP w0.254: v1(25,28.4) 24.4,27.8 24.28,27.8 24.27,27.79 21.86,27.79 21.86,27.79 U5.57 ; v1(36.59,23.07) 37,22.67 37,16.46 37.25,16.21 41.29,16.21 45.7,11.8 49.34,11.8 J11.5
  BOTTOM w0.254: v1(25,28.4) 25,27.34 28.73,23.61 36.06,23.61 v1(36.59,23.07)
PB6: length 35.1
  TOP w0.254: J3.3 48.78,28 41.55,28 41.2,28.35 v1(41.2,29.2) ; U5.58 25.51,27.29 25.52,27.3 v1(26.2,27.3)
  BOTTOM w0.254: v1(41.2,29.2) 41.2,27.17 40.95,26.92 38.18,26.92 38.13,26.96 38.1,26.96 37.76,27.3 29.3,27.3 28.88,26.88 27.37,26.88 26.95,27.3 v1(26.2,27.3)
PB7: length 2.7
  TOP w0.254: v1(19.3,26.8) 19.31,26.79 U5.59
  BOTTOM w0.254: J7.1 v1(19.3,26.8)
PB8: length 45.4
  TOP w0.254: J3.10 50.11,48.16 49.9,47.95 49.9,46.38 42.42,38.9 36.15,38.9 32.82,35.58 32.13,35.58 v1(31.6,35.05) ; U5.61 22.45,25.79 v1(22.47,25.77)
  BOTTOM w0.254: v1(22.47,25.77) 21.94,26.31 21.94,31.69 24.05,33.81 31.27,33.81 31.6,34.14 v1(31.6,35.05)
PB9: length 40.5
  TOP w0.254: J3.9 49.82,45.62 42.6,38.4 36.25,38.4 36.23,38.38 36.21,38.38 28.72,30.81 28.72,30.8 27.22,29.29 27.22,26.95 26.47,26.2 24.6,26.2 23.4,25 22.13,25 21.84,25.29 U5.62
PB10: length 26.3
  TOP w0.254: U5.29 34.28,30.29 35.34,31.35 36.69,31.35 37.63,30.41 38.09,30.41 38.35,30.15 38.35,26.36 45.86,18.85 49.97,18.85 50.12,18.7 J11.7
PC0: length 41.4
  TOP w0.254: J10.6 3.65,4.21 3.65,4.55 4.84,5.74 24.94,5.74 26.44,7.24 26.44,10.29 26.7,10.55 v1(26.7,11.3) ; U5.8 26.5,20.67 26.52,20.66 26.52,20.58 27.3,19.8 27.3,17.7 v1(26.5,16.9)
  BOTTOM w0.254: v1(26.5,16.9) 25.9,16.3 25.9,12.1 v1(26.7,11.3)
PC1: length 39.7
  TOP w0.254: U5.9 27,20.8 27.78,20.02 v1(27.78,16.68) ; v1(27,13.1) 26.15,13.1 25.9,12.85 25.9,7.6 24.51,6.21 4.16,6.21 3.95,6 J10.5
  BOTTOM w0.254: v1(27.78,16.68) 27,15.9 v1(27,13.1)
PC2: length 58.8
  TOP w0.254: BLE1.11 48.2,57.2 50.53,54.87 50.53,53.25 50.2,52.92 R18.1 49.31,51.1 48.9,50.69 48.9,46 42.9,40 v1(41.8,40) ; U5.10 27.5,23.14 27.5,23.15 27.5,24.5 28.4,25.4 28.4,26.61 28.09,26.92 v1(28.09,27.68) ; v1(43,35.8) 42.03,34.83 42.03,30.83 v1(41.5,30.3)
  BOTTOM w0.254: v1(43,35.8) 41.8,37 v1(41.8,40) ; v1(41.5,30.3) 40.75,30.3 40.45,30 40.45,27.72 40.08,27.35 38.25,27.35 37.92,27.68 v1(28.09,27.68)
PC3: length 42.3
  TOP w0.254: v1(42.3,28.75) 42.3,29.6 42.6,29.9 42.6,33.7 v1(44.7,35.8) ; v1(42.6,41.6) 41.97,42.23 R24.2 41.97,44.79 41.3,45.46 U7.1 ; v1(29.25,26.22) 29.25,25.47 28,24.22 U5.11
  BOTTOM w0.254: v1(42.6,41.6) 42.6,37.9 v1(44.7,35.8) ; v1(42.3,28.75) 42.3,26.81 42.05,26.55 41.49,26.55 41.47,26.54 37.86,26.54 37.49,26.91 29.94,26.91 v1(29.25,26.22)
PC4: length 14.7
  TOP w0.254: v1(34.8,25.34) 34.8,26.92 33.93,27.79 U5.24 ; v1(41.78,25.35) 42.53,25.35 42.88,25 v1(45.4,25)
  BOTTOM w0.254: v1(34.8,25.34) 35.55,25.34 35.56,25.35 v1(41.78,25.35)
PC6: length 23.3
  TOP w0.254: v1(29.8,37.5) 28.99,37.5 28.22,36.73 28.22,35.52 28.5,35.23 U5.37 ; R21.2 36.43,51.38 36.05,51 v1(35.3,51)
  BOTTOM w0.254: v1(29.8,37.5) 29.8,46.43 34.37,51 v1(35.3,51)
PC7: length 29.8
  TOP w0.254: J3.2 49.16,27.84 48.93,27.62 40.9,27.62 40.4,28.11 40.4,29.55 39.85,30.1 v1(39.1,30.1) ; U5.38 28,32.7 v1(27.8,32.5)
  BOTTOM w0.254: v1(39.1,30.1) 38.48,29.47 38.47,29.47 37.89,28.9 30,28.9 27.8,31.1 v1(27.8,32.5)
PC8: length 22.8
  TOP w0.254: R25.2 35.37,48.53 35.37,45.71 35.09,45.43 28.95,45.43 28.1,44.58 v1(28.1,41.3) ; v1(27.83,37.63) 27.83,36.88 27.5,36.55 U5.39
  BOTTOM w0.254: v1(28.1,41.3) 28.1,38.65 27.83,38.38 v1(27.83,37.63)
PC9: length 19
  TOP w0.254: R26.2 36.43,43.23 31.6,38.4 29.89,38.4 29.89,38.4 27.26,38.4 27,38.14 U5.40
PC10: length 13.7
  TOP w0.254: U5.51 19.47,30.79 19.42,30.85 17.58,30.85 17.22,30.49 16.58,30.49 15.9,29.81 15.9,27.08 15.65,26.83 13.35,26.83 13.1,27.08 U4.4 13.1,29.76
PC11: length 10.9
  TOP w0.254: U5.52 17.59,30.29 v1(16.8,29.5) ; v1(16.8,32.3) 16,32.3 14.7,31 U4.7 13.85,31
  BOTTOM w0.254: 17.05,29.75 v1(16.8,29.5)
  BOTTOM w0.3: v1(16.8,29.5) v1(16.8,32.3)
PC12: length 12.6
  TOP w0.254: 13.85,30.5 U4.6 14.9,30.5 15.95,31.55 17.11,31.55 18.34,32.77 21.27,32.77 21.88,32.16 21.88,30.13 21.54,29.79 U5.53
PC13: length 47.2
  TOP w0.254: SW1.1 16.24,42.75 16.5,42.49 C2.1 v1(16.5,34.3) ; SW1.1 11.35,44.79 11.65,45.1 11.97,45.1 R1.2 ; SW1.1 SW1.2 ; v1(18,29.2) 18.53,28.67 18.53,20.57 19.4,19.7 22.9,19.7 23.5,20.3 23.5,20.86 U5.2
  BOTTOM w0.254: v1(18,29.2) 18,29.95 17.7,30.25 17.7,33.1 v1(16.5,34.3)
PC14: length 13.6
  TOP w0.254: Y2.1 17.3,16.21 17.2,16.31 C14.1 17.2,18.8 17.55,19.15 23.25,19.15 24,19.9 U5.3
PC15: length 20.4
  TOP w0.254: C16.2 17.33,8.69 17.3,8.72 Y2.4 18.19,10.79 18.5,11.11 18.5,18.35 18.75,18.6 23.4,18.6 24.5,19.7 U5.4
PD2: length 6.8
  TOP w0.254: v1(20.67,34.04) 21.42,33.29 21.43,33.29 22.4,32.32 22.4,29.82 21.87,29.29 U5.54
USB_ID: length 26.3
  TOP w0.254: v1(23.2,38.1) 23.2,39 12.83,49.37 R13.2 ; R10.1 26.05,39.3 25.8,39.05 v1(25.8,38.1) 25.8,37.35 25.5,37.05 U5.43
  BOTTOM w0.254: v1(23.2,38.1) v1(25.8,38.1)
VUSB: length 50.2
  TOP w0.254: U6.1 5.75,55.5
  TOP w0.45: 5.75,55.5 5.75,58.45 4.11,60.09 1.7,60.09 1.65,60.15 U1.4
  TOP w1: v1(1.6,60.1) 1.65,60.15 ; SW2.2 SW2.5 12.2,75 D6.1 11.2,72.07 10.33,71.2 v1(9.2,71.2) R3.2 11.27,69.13 C1.1
  BOTTOM w1: v1(1.6,60.1) 1.6,60.85 1.6,60.86 1.6,72.2 2.6,73.2 8.2,73.2 9.2,72.2 v1(9.2,71.2)
N04115: length 7.8
  TOP w0.254: v1(36.2,32.2) 35.45,32.2 34.04,30.79 U5.30
  BOTTOM w0.254: v1(37.9,34.76) 37.05,34.76 36.73,34.44 36.73,32.73 v1(36.2,32.2)
N10061: length 20.8
  TOP w0.8: U1.3 1.65,69.25 3.1,70.7 J1.+
  TOP w1: D6.2 10.75,78 9.19,76.44 8.89,76.44 7.65,75.2 C3.1 7.2,73.06 6.47,72.34 J1.+
N10069: length 37.4
  TOP w0.5: 23.42,67.36 23.42,66.24 23.43,66.23 23.43,63.91 23.9,63.45 U2.8 U2.1
  TOP w1: 17.9,64.5 17.9,66.95 19.55,68.6 C5.1 ; 17.9,64.5 D2.1 ; 17.9,64.5 C4.2 ; L1.1 24.66,67.36 23.42,67.36 22.18,68.6 C5.1 ; C5.1 20,70.04 20.05,70.09 SW2.1 SW2.4
N11773: length 3.3
  TOP w0.8: R2.2 6.17,61.16 5.61,61.72 U1.5
N12723: length 5.5
  TOP w0.5: L1.2 27.49,66.02 26.9,65.43 26.9,63.45 26.4,62.95 U2.5
N14490: length 17.7
  TOP w0.5: U2.2 24.54,57.13 R5.1
  TOP w1: C6.1 29,56.2 27,54.2 23.5,54.2 23.1,54.6 R5.1 21.4,57.4 R6.2
N017320: length 3.4
  TOP w1: R7.2 35.88,55.67 35.91,55.69 D3.A
N105400: length 2.9
  TOP w0.8: U1.1 5.04,63.88 5.26,64.1 D1.C
N113222: length 6.9
  TOP w0.254: R9.2 v1(17.6,22.2) ; v1(19.3,22.2) 22.41,22.2 22.61,22 U5.1
  BOTTOM w0.254: v1(17.6,22.2) v1(19.3,22.2)
N120430: length 3.2
  TOP w1: D1.A 8.41,66.21 R3.1
N162657: length 9.9
  BOTTOM w0.254: v1(41.3,4.9) 39.21,4.9 38.7,5.41 v1(38.7,12.5)
N175467: length 5.3
  TOP w0.254: U6.3 8.3,54.2 9,53.5 R12.1
N175511: length 12
  TOP w1: J13.1 34.27,75.17 33.48,74.38 31.32,74.38 29.69,76.01 27.9,76.01 ; M1.3 27.9,76.01 ; 27.9,76.01 27.9,77.5 D4.2 28.7,77.83
N175521: length 6.7
  TOP w0.254: R13.1 8.5,51.1 8.1,51.5 8.1,52.5 7.05,53.55 U6.4
N175669: length 1.9
  TOP w1: R20.2 26.96,73.17 M1.1
N176603: length 5.7
  TOP w0.254: C2.2 v1(18.6,41.8)
  BOTTOM w0.254: v1(18.6,41.8) 23.35,41.8 23.45,41.7 v1(24.2,41.7)
N177015: length 3.2
  TOP w1: R15.1 21.45,53.1 21.85,52.7 D5.1
N177019: length 3
  TOP w1: R17.1 D5.3
N177181: length 2.6
  TOP w1: Q2.3 29.1,50.7 29,50.6 D5.5
N177185: length 3.3
  TOP w1: Q3.3 28.88,47.3 28.62,47.55 28.62,48.02 28.15,48.49 D5.4
N177253: length 3.2
  TOP w0.254: Q1.1 33.64,53.06 R21.1
N177329: length 3
  TOP w0.254: Q2.1 33.25,49.76 33.41,49.6 R25.1
N177405: length 3
  TOP w0.254: Q3.1 33.17,46.36 33.41,46.6 R26.1
N1626050: length 76.3
  TOP w0.254: SW4.2 35.75,5.85 36,6.1 48.33,6.1 49.4,5.03 49.4,1.45 49.65,1.2 52.65,1.2 52.9,1.45 52.9,49 52.2,49.7 51.4,49.7 51.27,49.83 51.27,51.85 51.6,52.18 R27.1
N1752391: length 5.5
  TOP w0.254: U6.2 8.15,54.85 9.2,55.9 R11.1
N1768891: length 3.1
  TOP w1: R16.1 21.65,50.8 21.85,50.6 D5.2
N1770832: length 3
  TOP w1: D5.6 27.27,52.7 28.6,54 Q1.3

## Copper pours and planes (outline as drawn; the poured copper is in the pictures)
0 on TOP: 0,80 54,80 54,74.9 42.4,74.9 42.4,59.7 48.4,59.7 48.4,55.4 54,55.4 54,0 0,0 ; 24 cut-outs
0 on BOTTOM: 0,80 54,80 54,74.9 42.4,74.9 42.4,59.7 48.4,59.7 48.4,55.4 54,55.4 54,0 0,0 ; 18 cut-outs

## Text on the board
Ref Des/Silkscreen Bottom: A5 | A4 | A3 | ENSMM | 3V3 | BOOT0 | PWM/CS/D10 | GND | D8 | 1 | PWM/D9 | VIN | TCK | TMS | RST | www.supmicrotech.fr
Ref Des/Silkscreen Top: C | A5 | NC | IOREF | A4 | 5V | A0 | A1 | A2 | A3 | NRST | 3V3 | GND | User1 | Reset | + | - | A | RST | 1 | www.supmicrotech.fr | ON | Z | X | Debug | Y | OFF | PWM | Prog | Run | PWR ON | PWM/MOSI/D11 | PWM/CS/D10 | MISO/D12 | SDA/D14 | SCK/D13 | SCL/D15 | PWM/D6 | PWM/D5 | PWM/D9 | PWM/D3 | TX/D1 | AVD0 | D8 | D4 | D7 | D2 | VIN | Charging | TCK | TMS | ObCP V2.3 REV 07/23 | RX/D0
COMPVAL_TYPE_TOP: Button | Push
NCLEGEND-1-2: FIGURE | FINISHED_SIZE | 0.4 | 0.8 | 0.9 | 1.0 | 3.2 | DRILL CHART: TOP to BOTTOM | ALL UNITS ARE IN MILLIMETERS | PLATED | NON-PLATED | QTY | 176 | 2 | 4 | 28
